# Altium PCB ZYNQ_BOARD.PcbDoc (part 9 of 9)
Units mm, origin at the board's own origin, x right, y up, seen from the top; angles counter-clockwise.
Board outline 120 x 66 mm, 10 copper layers (Top Layer, Internal Plane 1 (GND), Middle Layer 1, Middle Layer 2, Internal Plane 2 (+1.0V), Middle Layer 3, Middle Layer 4, Middle Layer 5 (PWR), Internal Plane 3 (GND), Bottom Layer), stack 0.982 mm thick; 333 components, 331 nets, 1511 pads, 1077 vias.
Unrouted connection lines stored in the file: 30.
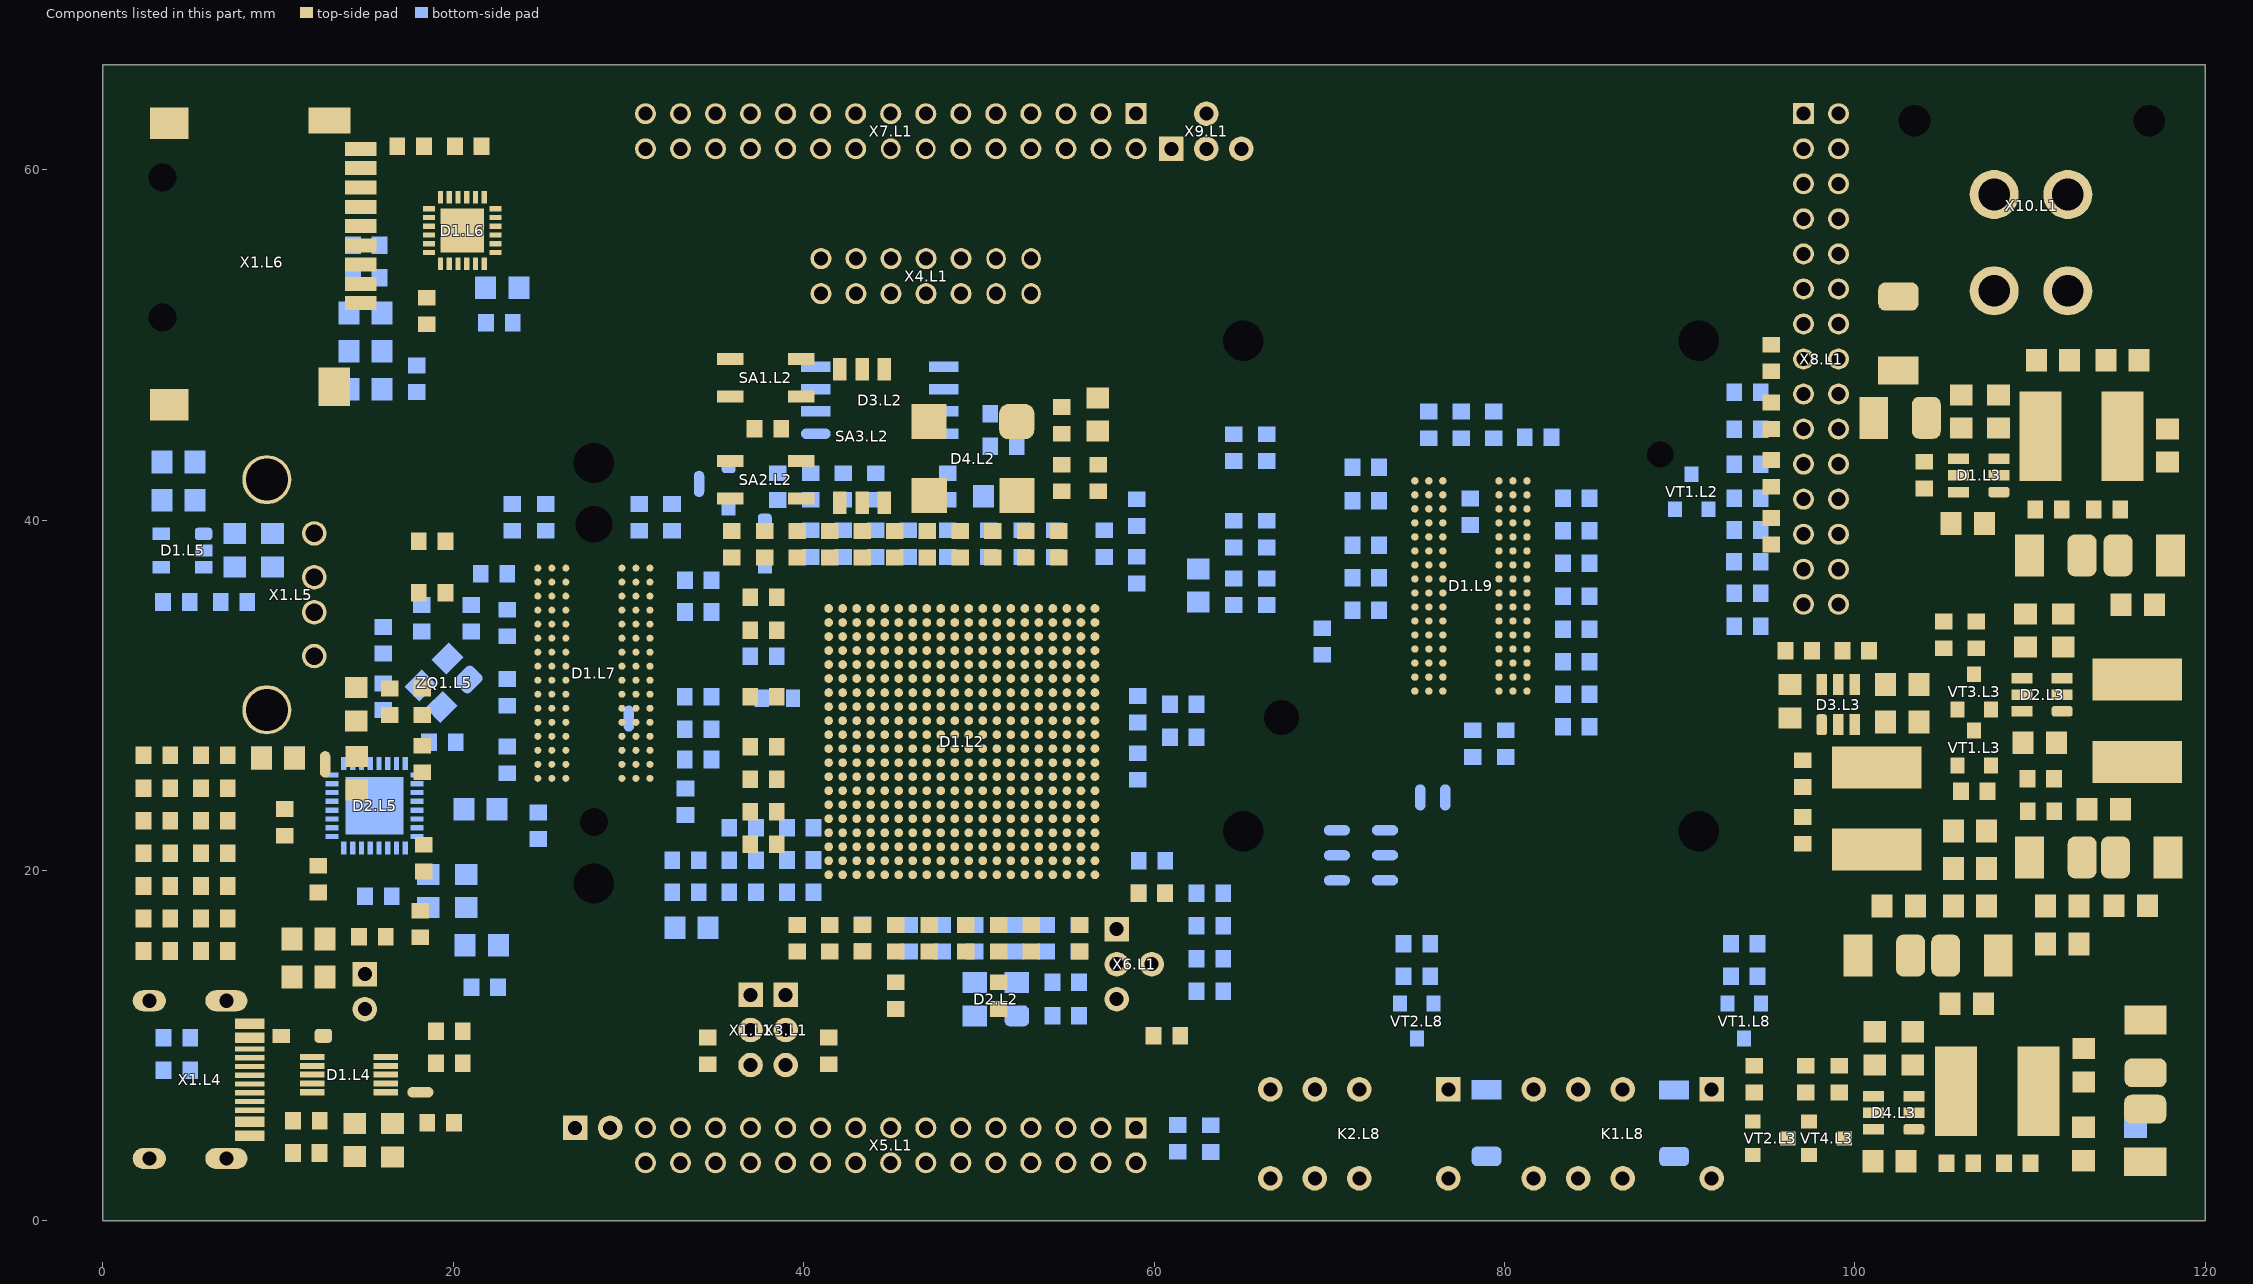
[diagram p17: the components of this part, seen from the top]

## Other copper (continued)
Internal Plane 1 (GND):
  pour cut-out: 1.78,51.576 cw(c3.385,51.576) 4.99,51.576 cw(c3.385,51.576) 3.385,49.971 cw(c3.385,51.576)
  pour cut-out: 1.78,59.576 cw(c3.385,59.576) 4.99,59.576 cw(c3.385,59.576) 3.385,57.971 cw(c3.385,59.576)
  pour cut-out: 10.941,34.557 cw(c12.044,34.73) 12.686,33.817 cw(c12.044,34.73)
  pour cut-out: 10.941,36.557 cw(c12.044,36.73) 12.686,35.817 cw(c12.044,36.73)
  pour cut-out: 26.421,18.369 cw(c28.025,19.246) 29.52,18.195 cw(c28.025,19.246)
  pour cut-out: 26.421,42.369 cw(c28.025,43.246) 29.52,42.195 cw(c28.025,43.246)
  pour cut-out: 68.051,2.242 cw(c69.154,2.415) 69.796,1.502 cw(c69.154,2.415)
  pour cut-out: 65.511,2.242 cw(c66.614,2.415) 67.256,1.502 cw(c66.614,2.415)
  pour cut-out: 68.051,7.322 cw(c69.154,7.495) 69.796,6.582 cw(c69.154,7.495)
  pour cut-out: 65.511,7.322 cw(c66.614,7.495) 67.256,6.582 cw(c66.614,7.495)
  pour cut-out: 65.675,28.735 cw(c67.28,28.735) 68.885,28.735 cw(c67.28,28.735) 67.28,27.13 cw(c67.28,28.735)
  pour cut-out: 75.671,2.242 cw(c76.774,2.415) 77.416,1.502 cw(c76.774,2.415)
  pour cut-out: 80.541,2.242 cw(c81.644,2.415) 82.286,1.502 cw(c81.644,2.415)
  pour cut-out: 83.081,2.242 cw(c84.184,2.415) 84.826,1.502 cw(c84.184,2.415)
  pour cut-out: 83.081,7.322 cw(c84.184,7.495) 84.826,6.582 cw(c84.184,7.495)
  pour cut-out: 80.541,7.322 cw(c81.644,7.495) 82.286,6.582 cw(c81.644,7.495)
  pour cut-out: 90.701,2.242 cw(c91.804,2.415) 92.446,1.502 cw(c91.804,2.415)
  pour cut-out: 89.481,49.349 cw(c91.085,50.226) 92.58,49.175 cw(c91.085,50.226)
  pour cut-out: 106.351,52.194 cw(c107.955,53.071) 109.45,52.02 cw(c107.955,53.071)
  pour cut-out: 106.351,57.694 cw(c107.955,58.571) 109.45,57.52 cw(c107.955,58.571)
  pour cut-out: 10.941,39.057 cw(c12.044,39.23) 12.686,38.317 cw(c12.044,39.23)
  pour cut-out: 27.96,24.082 cw(c28.01,22.755) 27.96,21.429 cw(c28.01,22.755)
  pour cut-out: 27.96,41.082 cw(c28.01,39.755) 27.96,38.429 cw(c28.01,39.755)
  pour cut-out: 39.861,54.742 cw(c40.964,54.915) 41.606,54.002 cw(c40.964,54.915)
  pour cut-out: 51.861,54.742 cw(c52.964,54.915) 53.606,54.002 cw(c52.964,54.915)
  pour cut-out: 89.481,21.349 cw(c91.085,22.226) 92.58,21.175 cw(c91.085,22.226)
  pour cut-out: 115.195,62.78 cw(c116.8,62.78) 118.405,62.78 cw(c116.8,62.78) 116.8,61.175 cw(c116.8,62.78)
  pour cut-out: 63.481,49.349 cw(c65.085,50.226) 66.58,49.175 cw(c65.085,50.226)
  pour cut-out: 85.621,2.242 cw(c86.724,2.415) 87.366,1.502 cw(c86.724,2.415)
  pour cut-out: 70.591,2.242 cw(c71.694,2.415) 72.336,1.502 cw(c71.694,2.415)
  pour cut-out: 85.621,7.322 cw(c86.724,7.495) 87.366,6.582 cw(c86.724,7.495)
  pour cut-out: 70.591,7.322 cw(c71.694,7.495) 72.336,6.582 cw(c71.694,7.495)
  pour cut-out: 87.275,43.735 cw(c88.88,43.735) 90.485,43.735 cw(c88.88,43.735) 88.88,42.13 cw(c88.88,43.735)
  pour cut-out: 63.481,21.349 cw(c65.085,22.226) 66.58,21.175 cw(c65.085,22.226)
  pour cut-out: 101.795,62.796 cw(c103.4,62.796) 105.005,62.796 cw(c103.4,62.796) 103.4,61.191 cw(c103.4,62.796)
  pour cut-out: 10.613,26.79 10.613,26.06 11.286,26.06 11.286,26.79
  pour cut-out: 11.513,22.95 11.513,21.95 11.713,21.75 12.105,21.75 12.6,22.245 12.6,22.672 12.079,23.193
  pour cut-out: 11.612,24.212 11.632,24.212 12.132,23.712 12.608,24.188 12.588,24.188 12.088,24.688
  pour cut-out: 11.99,56.026 11.99,55.353 13.35,55.353 13.35,56.026
  pour cut-out: 16.012,27.068 16.512,27.568 16.512,27.588 16.988,27.112 16.395,26.519 16.379,26.519
  pour cut-out: 18.392,22.712 18.912,22.192 18.912,22.122 19.388,22.598 18.914,23.071 18.73,23.071
  pour cut-out: 19.15,23.786 19.15,24.159 18.97,23.979 18.839,23.979
  pour cut-out: 18.912,24.768 18.912,24.708 18.392,24.188 18.809,23.771 18.866,23.771 19.388,24.292
  pour cut-out: 19.935,7.266 19.935,6.593 21.39,6.593 21.415,6.619 21.415,7.266
  pour cut-out: 24.696,51.545 24.696,50.93 24.663,50.896 24.03,50.896 24.03,51.538 24.023,51.545
  pour cut-out: 41.02,33.296 41.02,32.623 41.806,32.623 41.806,33.296
  pour cut-out: 42.62,35.696 42.622,35.695 43.408,35.695 43.408,35.022 43.407,35.023 42.62,35.023
  pour cut-out: 46.579,11.972 47.195,11.972 47.195,12.644 47.191,12.641 47.044,12.641 46.823,12.862
  pour cut-out: 46.243,13.03 46.243,12.308 46.916,12.308 46.916,13.03
  pour cut-out: 52.389,6.729 53.073,6.729 53.074,6.729 53.074,6.08 52.407,6.08 52.365,6.038
  pour cut-out: 60.611,33.936 61.63,34.956 61.63,35.022 61.6,35.022 61.25,35.372 60.28,34.402 60.28,34.376
  pour cut-out: 61.121,47.348 61.121,46.675 61.76,46.675 61.76,47.348
  pour cut-out: 117.616,34.334 117.621,34.334 117.899,34.612 118.029,34.482 118.029,34.125
  pour cut-out: 18.501,23.639 18.501,23.261 18.561,23.201 18.561,23.161 18.795,23.161 18.953,23.319 18.953,23.676
  pour cut-out: 20.163,24.1 20.163,23.441 20.836,23.441 20.836,24.1
  pour cut-out: 45.25,50.316 45.25,49.643 45.84,49.643 45.84,50.316
  pour cut-out: 55.173,17.96 55.173,17.22 55.639,17.22 55.639,17.842 55.58,17.9
  pour cut-out: 56.25,16.884 56.562,16.884 56.965,17.287 56.665,17.587 56.665,17.9
  pour cut-out: 61.29,12.669 61.29,11.256 62.03,11.256 62.03,12.669
  pour cut-out: 62.351,27.992 62.826,27.516 63.791,28.48 63.792,28.48 63.316,28.956
  pour cut-out: 115.695,5.666 115.695,4.993 116.37,4.993 116.37,5.666
  pour cut-out: 117.884,35.613 118.557,35.613 118.557,33.392 118.245,33.392 117.875,33.762
  pour cut-out: 7.37,6.006 7.37,5.333 8.88,5.333 8.88,6.006
  pour cut-out: 7.84,10.806 7.84,10.133 10.1,10.133 10.1,10.806
  pour cut-out: 21.752,6.93 21.752,6.19 21.079,6.19 21.079,6.487 20.895,6.671
  pour cut-out: 19.29,20.327 19.29,19.654 20.05,19.654 20.05,20.327
  pour cut-out: 14.982,27.068 15.458,26.592 15.458,26.696 15.922,27.161 15.372,27.512
  pour cut-out: 19.472,52.858 19.472,52.928 20.482,53.938 20.958,53.462 20.958,53.392 19.948,52.382
  pour cut-out: 23.102,55.042 23.108,55.042 23.741,54.409 23.883,54.551 23.883,54.969
  pour cut-out: 24.206,55.86 24.206,54.72 23.879,54.72 23.749,54.59 23.559,54.78 23.559,55.59
  pour cut-out: 45.355,48.738 46.028,48.738 46.028,48.06 45.355,48.06
  pour cut-out: 62.77,12.669 62.77,11.996 62.497,11.997 62.23,11.73 62.03,11.93 62.03,12.669 62.356,12.621
  pour cut-out: 96.703,10.43 96.703,9.69 97.04,9.353 99.26,9.353 99.597,9.69 99.597,10.43 99.26,10.766 97.04,10.766
  pour cut-out: 107.943,12.86 107.943,12.12 108.28,11.783 111.24,11.783 111.577,12.12 111.577,12.86 111.24,13.196 108.28,13.196
  pour cut-out: 113.78,33.729 113.78,33.056 118.221,33.056 117.548,33.729
  pour cut-out: 8.843,21.86 8.843,20.38 9.18,20.043 10.66,20.043 10.996,20.38 10.996,21.12 10.66,21.456 9.765,21.456 9.49,21.731
  pour cut-out: 10.918,36.704 10.918,34.642 10.93,34.63 10.999,34.699 13.17,34.699 13.17,36.832 13.154,36.848
  pour cut-out: 18.021,13.435 18.021,12.695 18.357,12.359 19.837,12.359 20.174,12.695 20.174,13.435 19.837,13.772 18.357,13.772
  pour cut-out: 16.012,19.312 16.488,19.788 16.468,19.788 15.988,20.268 15.512,19.792
  pour cut-out: 15.343,27.95 15.343,27.39 16.016,27.39 16.016,27.95
  pour cut-out: 23.766,50.674 23.369,50.277 23.162,50.277 23.162,50.095 23.529,49.729 24.042,50.242 24.122,50.242
  pour cut-out: 23.102,55.518 23.7,56.116 23.799,56.116 23.799,55.931 24.108,55.622
  pour cut-out: 46.132,36.119 46.132,35.384 46.156,35.36 45.483,35.36 45.483,36.095 45.459,36.119
  pour cut-out: 50.025,43.455 50.025,43.52 50.992,44.487 50.552,44.927 50.552,44.898 49.658,44.004
  pour cut-out: 55.51,18.297 56.99,18.297 56.99,18.22 57.252,17.958 56.756,17.462 55.899,17.462
  pour cut-out: 75.773,8.51 77.782,8.51 77.782,6.5 75.773,6.5
  pour cut-out: 90.803,8.51 92.812,8.51 92.812,6.5 90.803,6.5
  pour cut-out: 100.481,33.885 100.481,33.325 101.153,33.325 101.153,33.885
  pour cut-out: 105.904,38.17 105.904,36.69 106.24,36.353 107.72,36.353 108.057,36.69 108.057,38.17 107.72,38.506 106.24,38.506
  pour cut-out: 112.71,5.666 112.71,4.993 113.357,4.993 113.357,5.666
  pour cut-out: 112.415,12.991 112.415,10.771 112.751,10.434 113.535,10.434 114.568,11.468 114.568,12.991 114.232,13.328 112.751,13.328
  pour cut-out: 114.234,16.302 114.234,15.561 114.57,15.225 118.271,15.225 118.607,15.561 118.607,16.302 118.271,16.638 114.57,16.638
  pour cut-out: 116.05,33.64 116.052,33.64 116.74,34.328 116.74,34.469 117.48,34.469 117.751,34.199 117.751,33.605
  pour cut-out: 17.281,15.306 17.281,14.565 17.617,14.229 19.097,14.229 19.434,14.565 19.434,15.306 19.097,15.642 17.617,15.642
  pour cut-out: 19.259,48.63 19.932,48.63 19.932,46.84 19.259,46.84
  pour cut-out: 25.85,6.381 25.85,4.246 30.027,4.246 30.027,6.381
  pour cut-out: 33.673,15.072 33.673,13.592 34.01,13.256 34.75,13.256 35.826,14.332 35.826,15.072 35.49,15.409 34.01,15.409
  pour cut-out: 31.212,15.072 31.212,13.592 31.548,13.256 33.028,13.256 33.365,13.592 33.365,15.072 33.028,15.409 31.548,15.409
  pour cut-out: 56.715,17.812 60.991,17.812 60.991,11.511 56.715,11.511
  pour cut-out: 96.103,64.163 100.02,64.163 100.02,38.23 96.103,38.23
  pour cut-out: 35.89,14.052 40.096,14.052 40.096,7.751 35.89,7.751
  pour cut-out: 16.011,15.19 13.876,15.19 13.876,11.013 16.011,11.013
  pour cut-out: 40.94,53.79 40.966,53.816 40.966,56.041 52.966,56.041 52.94,56.015 52.94,53.79
  pour cut-out: 59.827,60.245 59.827,64.161 66.129,64.161 66.129,60.245
  pour cut-out: 59.928,6.281 59.928,2.365 31.909,2.365 31.909,6.281
  pour cut-out: 59.928,64.161 59.928,60.245 31.95,60.245 31.95,64.161
Internal Plane 3 (GND):
  pour cut-out: 65.512,2.242 cw(c66.614,2.415) 67.256,1.502 cw(c66.614,2.415)
  pour cut-out: 1.78,51.577 cw(c3.385,51.576) 4.99,51.577 cw(c3.385,51.576) 3.385,49.972 cw(c3.385,51.576)
  pour cut-out: 27.96,24.082 cw(c28.01,22.756) 27.96,21.429 cw(c28.01,22.756)
  pour cut-out: 63.482,49.349 cw(c65.085,50.226) 66.58,49.175 cw(c65.085,50.226)
  pour cut-out: 51.862,54.742 cw(c52.964,54.915) 53.606,54.002 cw(c52.964,54.915)
  pour cut-out: 39.862,54.742 cw(c40.964,54.915) 41.606,54.002 cw(c40.964,54.915)
  pour cut-out: 10.942,34.557 cw(c12.044,34.73) 12.686,33.817 cw(c12.044,34.73)
  pour cut-out: 10.942,36.557 cw(c12.044,36.73) 12.686,35.817 cw(c12.044,36.73)
  pour cut-out: 10.942,39.057 cw(c12.044,39.23) 12.686,38.317 cw(c12.044,39.23)
  pour cut-out: 80.542,2.242 cw(c81.644,2.415) 82.286,1.502 cw(c81.644,2.415)
  pour cut-out: 90.702,2.242 cw(c91.804,2.415) 92.446,1.502 cw(c91.804,2.415)
  pour cut-out: 85.622,2.242 cw(c86.724,2.415) 87.366,1.502 cw(c86.724,2.415)
  pour cut-out: 83.082,2.242 cw(c84.184,2.415) 84.826,1.502 cw(c84.184,2.415)
  pour cut-out: 85.622,7.322 cw(c86.724,7.495) 87.366,6.582 cw(c86.724,7.495)
  pour cut-out: 83.082,7.322 cw(c84.184,7.495) 84.826,6.582 cw(c84.184,7.495)
  pour cut-out: 80.542,7.322 cw(c81.644,7.495) 82.286,6.582 cw(c81.644,7.495)
  pour cut-out: 75.672,2.242 cw(c76.774,2.415) 77.416,1.502 cw(c76.774,2.415)
  pour cut-out: 70.592,7.322 cw(c71.694,7.495) 72.336,6.582 cw(c71.694,7.495)
  pour cut-out: 68.052,7.322 cw(c69.154,7.495) 69.796,6.582 cw(c69.154,7.495)
  pour cut-out: 65.512,7.322 cw(c66.614,7.495) 67.256,6.582 cw(c66.614,7.495)
  pour cut-out: 70.592,2.242 cw(c71.694,2.415) 72.336,1.502 cw(c71.694,2.415)
  pour cut-out: 68.052,2.242 cw(c69.154,2.415) 69.796,1.502 cw(c69.154,2.415)
  pour cut-out: 27.96,41.082 cw(c28.01,39.756) 27.96,38.429 cw(c28.01,39.756)
  pour cut-out: 1.78,59.577 cw(c3.385,59.576) 4.99,59.577 cw(c3.385,59.576) 3.385,57.972 cw(c3.385,59.576)
  pour cut-out: 26.422,18.369 cw(c28.025,19.246) 29.52,18.195 cw(c28.025,19.246)
  pour cut-out: 26.422,42.369 cw(c28.025,43.246) 29.52,42.195 cw(c28.025,43.246)
  pour cut-out: 63.482,21.349 cw(c65.085,22.226) 66.58,21.175 cw(c65.085,22.226)
  pour cut-out: 89.482,21.349 cw(c91.085,22.226) 92.58,21.175 cw(c91.085,22.226)
  pour cut-out: 89.482,49.349 cw(c91.085,50.226) 92.58,49.175 cw(c91.085,50.226)
  pour cut-out: 106.352,52.194 cw(c107.955,53.071) 109.45,52.02 cw(c107.955,53.071)
  pour cut-out: 106.352,57.694 cw(c107.955,58.571) 109.45,57.52 cw(c107.955,58.571)
  pour cut-out: 115.195,62.78 cw(c116.8,62.78) 118.405,62.78 cw(c116.8,62.78) 116.8,61.175 cw(c116.8,62.78)
  pour cut-out: 101.795,62.797 cw(c103.4,62.796) 105.005,62.797 cw(c103.4,62.796) 103.4,61.192 cw(c103.4,62.796)
  pour cut-out: 87.275,43.735 cw(c88.88,43.735) 90.485,43.735 cw(c88.88,43.735) 88.88,42.13 cw(c88.88,43.735)
  pour cut-out: 65.675,28.735 cw(c67.28,28.735) 68.885,28.735 cw(c67.28,28.735) 67.28,27.13 cw(c67.28,28.735)
  pour cut-out: 105.904,38.17 105.904,36.69 106.24,36.353 107.721,36.353 108.057,36.69 108.057,38.17 107.721,38.506 106.24,38.506
  pour cut-out: 117.616,34.334 117.621,34.334 117.899,34.612 118.029,34.482 118.029,34.125
  pour cut-out: 116.05,33.64 116.052,33.64 116.741,34.328 116.741,34.469 117.481,34.469 117.751,34.199 117.751,33.605
  pour cut-out: 113.78,33.729 113.78,33.056 118.221,33.056 117.548,33.729
  pour cut-out: 117.884,35.613 118.557,35.613 118.557,33.392 118.245,33.392 117.875,33.763
  pour cut-out: 100.481,33.885 100.481,33.325 101.154,33.325 101.154,33.885
  pour cut-out: 114.234,16.302 114.234,15.562 114.57,15.225 118.271,15.225 118.607,15.562 118.607,16.302 118.271,16.638 114.57,16.638
  pour cut-out: 112.415,12.991 112.415,10.771 112.751,10.435 113.535,10.435 114.568,11.468 114.568,12.991 114.232,13.328 112.751,13.328
  pour cut-out: 107.944,12.86 107.944,12.12 108.28,11.783 111.241,11.783 111.577,12.12 111.577,12.86 111.241,13.196 108.28,13.196
  pour cut-out: 112.71,5.666 112.71,4.994 113.357,4.994 113.357,5.666
  pour cut-out: 115.695,5.666 115.695,4.994 116.37,4.994 116.37,5.666
  pour cut-out: 96.704,10.43 96.704,9.69 97.04,9.353 99.26,9.353 99.597,9.69 99.597,10.43 99.26,10.766 97.04,10.766
  pour cut-out: 41.02,33.296 41.02,32.624 41.806,32.624 41.806,33.296
  pour cut-out: 40.941,53.79 40.967,53.816 40.967,56.041 52.967,56.041 52.941,56.015 52.941,53.79
  pour cut-out: 10.918,36.704 10.918,34.642 10.93,34.631 10.999,34.699 13.17,34.699 13.17,36.832 13.154,36.848
  pour cut-out: 90.803,8.51 92.812,8.51 92.812,6.5 90.803,6.5
  pour cut-out: 75.773,8.51 77.782,8.51 77.782,6.5 75.773,6.5
  pour cut-out: 62.351,27.992 62.827,27.516 63.791,28.48 63.792,28.48 63.316,28.956
  pour cut-out: 62.77,12.669 62.77,11.996 62.497,11.997 62.23,11.73 62.03,11.93 62.03,12.669 62.357,12.621
  pour cut-out: 61.29,12.669 61.29,11.256 62.03,11.256 62.03,12.669
  pour cut-out: 52.389,6.729 53.073,6.729 53.074,6.729 53.074,6.08 52.407,6.08 52.365,6.038
  pour cut-out: 56.25,16.884 56.562,16.884 56.965,17.287 56.665,17.587 56.665,17.9
  pour cut-out: 55.51,18.297 56.99,18.297 56.99,18.221 57.252,17.959 56.756,17.462 55.899,17.462
  pour cut-out: 55.174,17.96 55.174,17.22 55.639,17.22 55.639,17.842 55.58,17.9
  pour cut-out: 60.611,33.937 61.63,34.956 61.63,35.022 61.6,35.022 61.25,35.372 60.28,34.402 60.28,34.376
  pour cut-out: 61.121,47.349 61.121,46.676 61.76,46.676 61.76,47.349
  pour cut-out: 50.025,43.455 50.025,43.52 50.992,44.487 50.553,44.927 50.553,44.898 49.658,44.004
  pour cut-out: 45.25,50.316 45.25,49.644 45.84,49.644 45.84,50.316
  pour cut-out: 45.355,48.738 46.028,48.738 46.028,48.06 45.355,48.06
  pour cut-out: 16.011,15.19 13.876,15.19 13.876,11.013 16.011,11.013
  pour cut-out: 25.85,6.381 25.85,4.246 30.027,4.246 30.027,6.381
  pour cut-out: 46.58,11.972 47.195,11.972 47.195,12.645 47.191,12.641 47.044,12.641 46.823,12.862
  pour cut-out: 46.243,13.03 46.243,12.308 46.916,12.308 46.916,13.03
  pour cut-out: 23.766,50.674 23.37,50.277 23.162,50.277 23.162,50.095 23.529,49.729 24.042,50.242 24.122,50.242
  pour cut-out: 24.696,51.545 24.696,50.93 24.663,50.897 24.03,50.897 24.03,51.538 24.024,51.545
  pour cut-out: 23.102,55.042 23.108,55.042 23.741,54.409 23.883,54.551 23.883,54.969
  pour cut-out: 24.206,55.86 24.206,54.72 23.88,54.72 23.75,54.59 23.559,54.78 23.559,55.59
  pour cut-out: 23.102,55.518 23.7,56.116 23.799,56.116 23.799,55.931 24.108,55.622
  pour cut-out: 19.472,52.858 19.472,52.928 20.482,53.938 20.958,53.462 20.958,53.392 19.948,52.382
  pour cut-out: 11.99,56.026 11.99,55.354 13.35,55.354 13.35,56.026
  pour cut-out: 19.26,48.63 19.933,48.63 19.933,46.84 19.26,46.84
  pour cut-out: 33.673,15.073 33.673,13.592 34.01,13.256 34.75,13.256 35.826,14.332 35.826,15.073 35.49,15.409 34.01,15.409
  pour cut-out: 31.212,15.073 31.212,13.592 31.548,13.256 33.028,13.256 33.365,13.592 33.365,15.073 33.028,15.409 31.548,15.409
  pour cut-out: 19.15,23.786 19.15,24.159 18.971,23.979 18.839,23.979
  pour cut-out: 18.501,23.639 18.501,23.261 18.561,23.201 18.561,23.161 18.795,23.161 18.954,23.319 18.954,23.676
  pour cut-out: 18.392,22.712 18.912,22.192 18.912,22.122 19.388,22.598 18.914,23.071 18.73,23.071
  pour cut-out: 18.912,24.768 18.912,24.708 18.392,24.188 18.809,23.771 18.867,23.771 19.388,24.292
  pour cut-out: 19.29,20.327 19.29,19.654 20.05,19.654 20.05,20.327
  pour cut-out: 20.164,24.1 20.164,23.442 20.836,23.442 20.836,24.1
  pour cut-out: 16.012,19.312 16.488,19.788 16.468,19.788 15.988,20.268 15.512,19.792
  pour cut-out: 18.021,13.435 18.021,12.695 18.357,12.359 19.838,12.359 20.174,12.695 20.174,13.435 19.838,13.772 18.357,13.772
  pour cut-out: 17.281,15.306 17.281,14.566 17.617,14.229 19.097,14.229 19.434,14.566 19.434,15.306 19.097,15.642 17.617,15.642
  pour cut-out: 21.752,6.93 21.752,6.19 21.079,6.19 21.079,6.487 20.895,6.671
  pour cut-out: 19.935,7.266 19.935,6.593 21.39,6.593 21.416,6.619 21.416,7.266
  pour cut-out: 7.37,6.006 7.37,5.334 8.88,5.334 8.88,6.006
  pour cut-out: 7.84,10.806 7.84,10.134 10.1,10.134 10.1,10.806
  pour cut-out: 14.982,27.068 15.458,26.592 15.458,26.697 15.922,27.161 15.372,27.512
  pour cut-out: 15.344,27.95 15.344,27.39 16.016,27.39 16.016,27.95
  pour cut-out: 16.012,27.068 16.512,27.568 16.512,27.588 16.988,27.112 16.395,26.519 16.379,26.519
  pour cut-out: 11.612,24.212 11.632,24.212 12.132,23.712 12.608,24.188 12.588,24.188 12.088,24.688
  pour cut-out: 10.614,26.79 10.614,26.06 11.286,26.06 11.286,26.79
  pour cut-out: 8.843,21.86 8.843,20.38 9.18,20.044 10.66,20.044 10.996,20.38 10.996,21.12 10.66,21.457 9.765,21.457 9.491,21.732
  pour cut-out: 11.514,22.95 11.514,21.95 11.714,21.75 12.105,21.75 12.6,22.245 12.6,22.672 12.079,23.193
  pour cut-out: 59.828,60.245 59.828,64.161 66.129,64.161 66.129,60.245
  pour cut-out: 56.716,17.812 60.991,17.812 60.991,11.511 56.716,11.511
  pour cut-out: 35.89,14.052 40.096,14.052 40.096,7.751 35.89,7.751
  pour cut-out: 46.132,36.119 46.132,35.384 46.156,35.36 45.484,35.36 45.484,36.095 45.46,36.119
  pour cut-out: 42.62,35.696 42.622,35.695 43.408,35.695 43.408,35.022 43.407,35.024 42.62,35.024
  pour cut-out: 59.928,64.161 59.928,60.245 31.95,60.245 31.95,64.161
  pour cut-out: 59.928,6.281 59.928,2.365 31.909,2.365 31.909,6.281
  pour cut-out: 96.104,64.163 100.02,64.163 100.02,38.23 96.104,38.23
Internal Plane 2 (+1.0V):
  pour cut-out: 96.28,51.117 ccw(c97.071,51.187) 97.588,51.791 ccw(c97.073,51.184)
  pour cut-out: 109.504,34.035 ccw(c109.719,34.656) 109.68,35.311 ccw(c109.719,34.656)
  pour cut-out: 70.384,44.9 ccw(c70.771,44.9) 71.159,44.9 ccw(c70.771,44.9) 70.771,45.287 ccw(c70.771,44.9)
  pour cut-out: 71.103,44.9 ccw(c71.49,44.9) 71.877,44.9 ccw(c71.49,44.9) 71.49,45.287 ccw(c71.49,44.9)
  pour cut-out: 71.103,45.518 ccw(c71.49,45.518) 71.877,45.518 ccw(c71.49,45.518) 71.49,45.905 ccw(c71.49,45.518)
  pour cut-out: 61.952,14.98 ccw(c62.34,14.98) 62.727,14.98 ccw(c62.34,14.98) 62.34,15.367 ccw(c62.34,14.98)
  pour cut-out: 62.383,12.333 ccw(c62.77,12.333) 63.158,12.333 ccw(c62.77,12.333) 62.77,12.72 ccw(c62.77,12.333)
  pour cut-out: 61.643,11.592 ccw(c62.03,11.592) 62.418,11.592 ccw(c62.03,11.592) 62.03,11.98 ccw(c62.03,11.592)
  pour cut-out: 60.903,11.592 ccw(c61.29,11.592) 61.677,11.592 ccw(c61.29,11.592) 61.29,11.98 ccw(c61.29,11.592)
  pour cut-out: 60.903,12.333 ccw(c61.29,12.333) 61.677,12.333 ccw(c61.29,12.333) 61.29,12.72 ccw(c61.29,12.333)
  pour cut-out: 61.643,12.333 ccw(c62.03,12.333) 62.418,12.333 ccw(c62.03,12.333) 62.03,12.72 ccw(c62.03,12.333)
  pour cut-out: 61.952,13.111 ccw(c62.34,13.111) 62.727,13.111 ccw(c62.34,13.111) 62.34,13.499 ccw(c62.34,13.111)
  pour cut-out: 63.552,13.111 ccw(c63.94,13.111) 64.327,13.111 ccw(c63.94,13.111) 63.94,13.499 ccw(c63.94,13.111)
  pour cut-out: 63.552,14.98 ccw(c63.94,14.98) 64.327,14.98 ccw(c63.94,14.98) 63.94,15.367 ccw(c63.94,14.98)
  pour cut-out: 110.853,12.12 ccw(c111.241,12.12) 111.628,12.12 ccw(c111.241,12.12) 111.241,12.507 ccw(c111.241,12.12)
  pour cut-out: 110.853,12.86 ccw(c111.241,12.86) 111.628,12.86 ccw(c111.241,12.86) 111.241,13.247 ccw(c111.241,12.86)
  pour cut-out: 110.113,12.86 ccw(c110.5,12.86) 110.888,12.86 ccw(c110.5,12.86) 110.5,13.247 ccw(c110.5,12.86)
  pour cut-out: 110.113,12.12 ccw(c110.5,12.12) 110.888,12.12 ccw(c110.5,12.12) 110.5,12.507 ccw(c110.5,12.12)
  pour cut-out: 109.373,12.12 ccw(c109.76,12.12) 110.148,12.12 ccw(c109.76,12.12) 109.76,12.507 ccw(c109.76,12.12)
  pour cut-out: 109.373,12.86 ccw(c109.76,12.86) 110.148,12.86 ccw(c109.76,12.86) 109.76,13.247 ccw(c109.76,12.86)
  pour cut-out: 108.633,12.12 ccw(c109.02,12.12) 109.408,12.12 ccw(c109.02,12.12) 109.02,12.507 ccw(c109.02,12.12)
  pour cut-out: 108.633,12.86 ccw(c109.02,12.86) 109.408,12.86 ccw(c109.02,12.86) 109.02,13.247 ccw(c109.02,12.86)
  pour cut-out: 107.893,12.86 ccw(c108.28,12.86) 108.667,12.86 ccw(c108.28,12.86) 108.28,13.247 ccw(c108.28,12.86)
  pour cut-out: 98.28,51.117 ccw(c99.071,51.187) 99.588,51.791 ccw(c99.073,51.184)
  pour cut-out: 94.813,50.02 ccw(c95.2,50.02) 95.587,50.02 ccw(c95.2,50.02) 95.2,50.407 ccw(c95.2,50.02)
  pour cut-out: 65.512,7.322 cw(c66.614,7.495) 67.256,6.582 cw(c66.614,7.495)
  pour cut-out: 55.35,37.26 ccw(c55.737,37.26) 56.125,37.26 ccw(c55.737,37.26) 55.737,37.648 ccw(c55.737,37.26)
  pour cut-out: 107.893,12.12 ccw(c108.28,12.12) 108.667,12.12 ccw(c108.28,12.12) 108.28,12.507 ccw(c108.28,12.12)
  pour cut-out: 95.826,15.333 ccw(c96.213,15.333) 96.6,15.333 ccw(c96.213,15.333) 96.213,15.72 ccw(c96.213,15.333)
  pour cut-out: 96.737,15.03 ccw(c97.125,15.03) 97.512,15.03 ccw(c97.125,15.03) 97.125,15.417 ccw(c97.125,15.03)
  pour cut-out: 96.737,15.58 ccw(c97.125,15.58) 97.512,15.58 ccw(c97.125,15.58) 97.125,15.967 ccw(c97.125,15.58)
  pour cut-out: 100.248,15.375 ccw(c100.635,15.375) 101.022,15.375 ccw(c100.635,15.375) 100.635,15.762 ccw(c100.635,15.375)
  pour cut-out: 100.242,15.97 ccw(c100.629,15.97) 101.017,15.97 ccw(c100.629,15.97) 100.629,16.357 ccw(c100.629,15.97)
  pour cut-out: 76.928,14.93 ccw(c77.316,14.93) 77.703,14.93 ccw(c77.316,14.93) 77.316,15.318 ccw(c77.316,14.93)
  pour cut-out: 100.242,14.75 ccw(c100.629,14.75) 101.017,14.75 ccw(c100.629,14.75) 100.629,15.137 ccw(c100.629,14.75)
  pour cut-out: 52.313,6.6 ccw(c52.7,6.6) 53.087,6.6 ccw(c52.7,6.6) 52.7,6.987 ccw(c52.7,6.6)
  pour cut-out: 100.899,10.18 ccw(c101.114,10.801) 101.075,11.456 ccw(c101.114,10.801)
  pour cut-out: 103.074,10.18 ccw(c103.289,10.801) 103.25,11.456 ccw(c103.289,10.801)
  pour cut-out: 111.659,34.035 ccw(c111.874,34.656) 111.835,35.311 ccw(c111.874,34.656)
  pour cut-out: 63.094,41.853 ccw(c63.481,41.854) 63.869,41.854 ccw(c63.481,41.854) 63.481,42.241 ccw(c63.481,41.854)
  pour cut-out: 41.489,43.286 ccw(c41.876,43.286) 42.263,43.286 ccw(c41.876,43.286) 41.876,43.673 ccw(c41.876,43.286)
  pour cut-out: 43.873,39.35 ccw(c44.26,39.35) 44.647,39.35 ccw(c44.26,39.35) 44.26,39.737 ccw(c44.26,39.35)
  pour cut-out: 42.04,39.206 ccw(c42.427,39.206) 42.815,39.206 ccw(c42.427,39.206) 42.427,39.593 ccw(c42.427,39.206)
  pour cut-out: 34.362,13.592 ccw(c34.75,13.592) 35.137,13.592 ccw(c34.75,13.592) 34.75,13.98 ccw(c34.75,13.592)
  pour cut-out: 33.622,13.592 ccw(c34.01,13.592) 34.397,13.592 ccw(c34.01,13.592) 34.01,13.98 ccw(c34.01,13.592)
  pour cut-out: 33.622,14.332 ccw(c34.01,14.332) 34.397,14.332 ccw(c34.01,14.332) 34.01,14.72 ccw(c34.01,14.332)
  pour cut-out: 34.362,14.332 ccw(c34.75,14.332) 35.137,14.332 ccw(c34.75,14.332) 34.75,14.72 ccw(c34.75,14.332)
  pour cut-out: 35.103,14.332 ccw(c35.49,14.332) 35.877,14.332 ccw(c35.49,14.332) 35.49,14.72 ccw(c35.49,14.332)
  pour cut-out: 35.103,15.073 ccw(c35.49,15.073) 35.877,15.073 ccw(c35.49,15.073) 35.49,15.46 ccw(c35.49,15.073)
  pour cut-out: 34.362,15.073 ccw(c34.75,15.073) 35.137,15.073 ccw(c34.75,15.073) 34.75,15.46 ccw(c34.75,15.073)
  pour cut-out: 33.622,15.073 ccw(c34.01,15.073) 34.397,15.073 ccw(c34.01,15.073) 34.01,15.46 ccw(c34.01,15.073)
  pour cut-out: 31.161,13.592 ccw(c31.548,13.592) 31.936,13.592 ccw(c31.548,13.592) 31.548,13.98 ccw(c31.548,13.592)
  pour cut-out: 31.901,13.592 ccw(c32.288,13.592) 32.676,13.592 ccw(c32.288,13.592) 32.288,13.98 ccw(c32.288,13.592)
  pour cut-out: 32.641,13.592 ccw(c33.028,13.592) 33.416,13.592 ccw(c33.028,13.592) 33.028,13.98 ccw(c33.028,13.592)
  pour cut-out: 32.641,14.332 ccw(c33.028,14.332) 33.416,14.332 ccw(c33.028,14.332) 33.028,14.72 ccw(c33.028,14.332)
  pour cut-out: 32.641,15.073 ccw(c33.028,15.073) 33.416,15.073 ccw(c33.028,15.073) 33.028,15.46 ccw(c33.028,15.073)
  pour cut-out: 31.901,14.332 ccw(c32.288,14.332) 32.676,14.332 ccw(c32.288,14.332) 32.288,14.72 ccw(c32.288,14.332)
  pour cut-out: 31.161,14.332 ccw(c31.548,14.332) 31.936,14.332 ccw(c31.548,14.332) 31.548,14.72 ccw(c31.548,14.332)
  pour cut-out: 31.901,15.073 ccw(c32.288,15.073) 32.676,15.073 ccw(c32.288,15.073) 32.288,15.46 ccw(c32.288,15.073)
  pour cut-out: 31.161,15.073 ccw(c31.548,15.073) 31.936,15.073 ccw(c31.548,15.073) 31.548,15.46 ccw(c31.548,15.073)
  pour cut-out: 37.943,22.453 ccw(c38.33,22.453) 38.717,22.453 ccw(c38.33,22.453) 38.33,22.841 ccw(c38.33,22.453)
  pour cut-out: 36.028,8.9 ccw(c36.964,8.9) 37.9,8.9 ccw(c36.964,8.9)
  pour cut-out: 38.028,8.9 ccw(c38.964,8.9) 39.9,8.9 ccw(c38.964,8.9)
  pour cut-out: 38.028,10.9 ccw(c38.964,10.9) 39.9,10.9 ccw(c38.964,10.9)
  pour cut-out: 36.028,10.9 ccw(c36.964,10.9) 37.9,10.9 ccw(c36.964,10.9)
  pour cut-out: 39.243,15.61 ccw(c39.63,15.61) 40.017,15.61 ccw(c39.63,15.61) 39.63,15.998 ccw(c39.63,15.61)
  pour cut-out: 41.378,15.61 ccw(c41.765,15.61) 42.153,15.61 ccw(c41.765,15.61) 41.765,15.998 ccw(c41.765,15.61)
  pour cut-out: 40.843,15.61 ccw(c41.23,15.61) 41.617,15.61 ccw(c41.23,15.61) 41.23,15.998 ccw(c41.23,15.61)
  pour cut-out: 37.373,38.43 ccw(c37.76,38.43) 38.147,38.43 ccw(c37.76,38.43) 37.76,38.817 ccw(c37.76,38.43)
  pour cut-out: 70.384,45.518 ccw(c70.771,45.518) 71.159,45.518 ccw(c70.771,45.518) 70.771,45.905 ccw(c70.771,45.518)
  pour cut-out: 67.713,44.187 ccw(c68.1,44.187) 68.487,44.187 ccw(c68.1,44.187) 68.1,44.574 ccw(c68.1,44.187)
  pour cut-out: 60.749,42.911 ccw(c61.136,42.911) 61.524,42.911 ccw(c61.136,42.911) 61.136,43.298 ccw(c61.136,42.911)
  pour cut-out: 61.243,43.19 ccw(c61.63,43.19) 62.017,43.19 ccw(c61.63,43.19) 61.63,43.577 ccw(c61.63,43.19)
  pour cut-out: 60.744,43.53 ccw(c61.132,43.53) 61.519,43.53 ccw(c61.132,43.53) 61.132,43.918 ccw(c61.132,43.53)
  pour cut-out: 54.77,39.865 ccw(c55.158,39.865) 55.545,39.865 ccw(c55.158,39.865) 55.158,40.252 ccw(c55.158,39.865)
  pour cut-out: 54.196,41.705 ccw(c54.583,41.705) 54.971,41.705 ccw(c54.583,41.705) 54.583,42.093 ccw(c54.583,41.705)
  pour cut-out: 51.893,47.681 ccw(c52.281,47.681) 52.668,47.681 ccw(c52.281,47.681) 52.281,48.068 ccw(c52.281,47.681)
  pour cut-out: 51.442,48.06 ccw(c51.83,48.06) 52.217,48.06 ccw(c51.83,48.06) 51.83,48.447 ccw(c51.83,48.06)
  pour cut-out: 49.125,47.173 ccw(c49.513,47.173) 49.9,47.173 ccw(c49.513,47.173) 49.513,47.561 ccw(c49.513,47.173)
  pour cut-out: 49.125,47.774 ccw(c49.513,47.774) 49.9,47.774 ccw(c49.513,47.774) 49.513,48.161 ccw(c49.513,47.774)
  pour cut-out: 48.203,47.475 ccw(c48.59,47.475) 48.977,47.475 ccw(c48.59,47.475) 48.59,47.862 ccw(c48.59,47.475)
  pour cut-out: 48.203,48.745 ccw(c48.59,48.745) 48.977,48.745 ccw(c48.59,48.745) 48.59,49.132 ccw(c48.59,48.745)
  pour cut-out: 48.203,46.205 ccw(c48.59,46.205) 48.977,46.205 ccw(c48.59,46.205) 48.59,46.592 ccw(c48.59,46.205)
  pour cut-out: 39.032,44.219 ccw(c39.419,44.219) 39.806,44.219 ccw(c39.419,44.219) 39.419,44.606 ccw(c39.419,44.219)
  pour cut-out: 38.202,44.229 ccw(c38.589,44.229) 38.976,44.229 ccw(c38.589,44.229) 38.589,44.616 ccw(c38.589,44.229)
  pour cut-out: 37.464,43.871 ccw(c37.852,43.871) 38.239,43.871 ccw(c37.852,43.871) 37.852,44.258 ccw(c37.852,43.871)
  pour cut-out: 36.443,40.23 ccw(c36.83,40.23) 37.217,40.23 ccw(c36.83,40.23) 36.83,40.617 ccw(c36.83,40.23)
  pour cut-out: 43.963,37.9 ccw(c44.35,37.9) 44.737,37.9 ccw(c44.35,37.9) 44.35,38.287 ccw(c44.35,37.9)
  pour cut-out: 52.741,7.027 ccw(c53.128,7.027) 53.516,7.027 ccw(c53.128,7.027) 53.128,7.414 ccw(c53.128,7.027)
  pour cut-out: 47.013,9.43 ccw(c47.4,9.43) 47.787,9.43 ccw(c47.4,9.43) 47.4,9.817 ccw(c47.4,9.43)
  pour cut-out: 46.807,12.308 ccw(c47.195,12.308) 47.582,12.308 ccw(c47.195,12.308) 47.195,12.696 ccw(c47.195,12.308)
  pour cut-out: 46.192,12.308 ccw(c46.58,12.308) 46.967,12.308 ccw(c46.58,12.308) 46.58,12.696 ccw(c46.58,12.308)
  pour cut-out: 46.192,13.03 ccw(c46.58,13.03) 46.967,13.03 ccw(c46.58,13.03) 46.58,13.417 ccw(c46.58,13.03)
  pour cut-out: 43.641,12.101 ccw(c44.029,12.101) 44.416,12.101 ccw(c44.029,12.101) 44.029,12.489 ccw(c44.029,12.101)
  pour cut-out: 43.641,12.8 ccw(c44.029,12.8) 44.416,12.8 ccw(c44.029,12.8) 44.029,13.187 ccw(c44.029,12.8)
  pour cut-out: 39.392,21.557 ccw(c39.78,21.557) 40.167,21.557 ccw(c39.78,21.557) 39.78,21.944 ccw(c39.78,21.557)
  pour cut-out: 38.873,22.19 ccw(c39.26,22.19) 39.647,22.19 ccw(c39.26,22.19) 39.26,22.577 ccw(c39.26,22.19)
  pour cut-out: 38.871,22.722 ccw(c39.259,22.722) 39.646,22.722 ccw(c39.259,22.722) 39.259,23.11 ccw(c39.259,22.722)
  pour cut-out: 38.193,23.34 ccw(c38.58,23.34) 38.967,23.34 ccw(c38.58,23.34) 38.58,23.727 ccw(c38.58,23.34)
  pour cut-out: 35.363,22.453 ccw(c35.75,22.453) 36.137,22.453 ccw(c35.75,22.453) 35.75,22.841 ccw(c35.75,22.453)
  pour cut-out: 32.143,20.6 ccw(c32.53,20.6) 32.917,20.6 ccw(c32.53,20.6) 32.53,20.987 ccw(c32.53,20.6)
  pour cut-out: 33.622,20.6 ccw(c34.01,20.6) 34.397,20.6 ccw(c34.01,20.6) 34.01,20.987 ccw(c34.01,20.6)
  pour cut-out: 35.362,20.6 ccw(c35.75,20.6) 36.137,20.6 ccw(c35.75,20.6) 35.75,20.987 ccw(c35.75,20.6)
  pour cut-out: 36.882,20.48 ccw(c37.27,20.48) 37.657,20.48 ccw(c37.27,20.48) 37.27,20.867 ccw(c37.27,20.48)
  pour cut-out: 36.883,18.75 ccw(c37.27,18.75) 37.657,18.75 ccw(c37.27,18.75) 37.27,19.137 ccw(c37.27,18.75)
  pour cut-out: 35.363,18.75 ccw(c35.75,18.75) 36.137,18.75 ccw(c35.75,18.75) 35.75,19.137 ccw(c35.75,18.75)
  pour cut-out: 32.103,18.74 ccw(c32.49,18.74) 32.877,18.74 ccw(c32.49,18.74) 32.49,19.127 ccw(c32.49,18.74)
  pour cut-out: 33.622,18.78 ccw(c34.01,18.78) 34.397,18.78 ccw(c34.01,18.78) 34.01,19.167 ccw(c34.01,18.78)
  pour cut-out: 34.153,16.74 ccw(c34.54,16.74) 34.927,16.74 ccw(c34.54,16.74) 34.54,17.127 ccw(c34.54,16.74)
  pour cut-out: 32.253,16.74 ccw(c32.64,16.74) 33.027,16.74 ccw(c32.64,16.74) 32.64,17.127 ccw(c32.64,16.74)
  pour cut-out: 33.834,50.12 ccw(c34.222,50.12) 34.609,50.12 ccw(c34.222,50.12) 34.222,50.507 ccw(c34.222,50.12)
  pour cut-out: 27.242,48.797 ccw(c27.629,48.797) 28.017,48.797 ccw(c27.629,48.797) 27.629,49.185 ccw(c27.629,48.797)
  pour cut-out: 19.513,41.063 ccw(c19.9,41.063) 20.287,41.063 ccw(c19.9,41.063) 19.9,41.451 ccw(c19.9,41.063)
  pour cut-out: 16.363,27.35 ccw(c16.75,27.35) 17.137,27.35 ccw(c16.75,27.35) 16.75,27.737 ccw(c16.75,27.35)
  pour cut-out: 15.863,26.83 ccw(c16.25,26.83) 16.637,26.83 ccw(c16.25,26.83) 16.25,27.217 ccw(c16.25,26.83)
  pour cut-out: 15.293,27.95 ccw(c15.68,27.95) 16.067,27.95 ccw(c15.68,27.95) 15.68,28.337 ccw(c15.68,27.95)
  pour cut-out: 15.293,27.39 ccw(c15.68,27.39) 16.067,27.39 ccw(c15.68,27.39) 15.68,27.777 ccw(c15.68,27.39)
  pour cut-out: 14.833,26.83 ccw(c15.22,26.83) 15.607,26.83 ccw(c15.22,26.83) 15.22,27.217 ccw(c15.22,26.83)
  pour cut-out: 16.739,32.02 ccw(c17.126,32.02) 17.514,32.02 ccw(c17.126,32.02) 17.126,32.407 ccw(c17.126,32.02)
  pour cut-out: 19.663,19.991 ccw(c20.05,19.991) 20.437,19.991 ccw(c20.05,19.991) 20.05,20.378 ccw(c20.05,19.991)
  pour cut-out: 18.903,19.991 ccw(c19.29,19.991) 19.677,19.991 ccw(c19.29,19.991) 19.29,20.378 ccw(c19.29,19.991)
  pour cut-out: 20.61,21.817 ccw(c20.998,21.817) 21.385,21.817 ccw(c20.998,21.817) 20.998,22.205 ccw(c20.998,21.817)
  pour cut-out: 20.113,23.442 ccw(c20.5,23.442) 20.887,23.442 ccw(c20.5,23.442) 20.5,23.829 ccw(c20.5,23.442)
  pour cut-out: 20.113,24.1 ccw(c20.5,24.1) 20.887,24.1 ccw(c20.5,24.1) 20.5,24.487 ccw(c20.5,24.1)
  pour cut-out: 18.763,22.36 ccw(c19.15,22.36) 19.537,22.36 ccw(c19.15,22.36) 19.15,22.747 ccw(c19.15,22.36)
  pour cut-out: 18.243,22.95 ccw(c18.63,22.95) 19.017,22.95 ccw(c18.63,22.95) 18.63,23.337 ccw(c18.63,22.95)
  pour cut-out: 18.763,23.45 ccw(c19.15,23.45) 19.537,23.45 ccw(c19.15,23.45) 19.15,23.837 ccw(c19.15,23.45)
  pour cut-out: 18.243,23.95 ccw(c18.63,23.95) 19.017,23.95 ccw(c18.63,23.95) 18.63,24.337 ccw(c18.63,23.95)
  pour cut-out: 18.763,24.53 ccw(c19.15,24.53) 19.537,24.53 ccw(c19.15,24.53) 19.15,24.917 ccw(c19.15,24.53)
  pour cut-out: 14.733,18.73 ccw(c15.12,18.73) 15.507,18.73 ccw(c15.12,18.73) 15.12,19.117 ccw(c15.12,18.73)
  pour cut-out: 16.363,20.64 ccw(c16.75,20.64) 17.137,20.64 ccw(c16.75,20.64) 16.75,21.027 ccw(c16.75,20.64)
  pour cut-out: 15.863,19.55 ccw(c16.25,19.55) 16.637,19.55 ccw(c16.25,19.55) 16.25,19.937 ccw(c16.25,19.55)
  pour cut-out: 15.363,20.03 ccw(c15.75,20.03) 16.137,20.03 ccw(c15.75,20.03) 15.75,20.417 ccw(c15.75,20.03)
  pour cut-out: 14.663,19.66 ccw(c15.05,19.66) 15.437,19.66 ccw(c15.05,19.66) 15.05,20.047 ccw(c15.05,19.66)
  pour cut-out: 13.393,19.49 ccw(c13.78,19.49) 14.167,19.49 ccw(c13.78,19.49) 13.78,19.877 ccw(c13.78,19.49)
  pour cut-out: 13.393,20.47 ccw(c13.78,20.47) 14.167,20.47 ccw(c13.78,20.47) 13.78,20.857 ccw(c13.78,20.47)
  pour cut-out: 12.936,21.285 ccw(c13.324,21.285) 13.711,21.285 ccw(c13.324,21.285) 13.324,21.672 ccw(c13.324,21.285)
  pour cut-out: 13.863,22.45 ccw(c14.25,22.45) 14.637,22.45 ccw(c14.25,22.45) 14.25,22.837 ccw(c14.25,22.45)
  pour cut-out: 15.113,22.45 ccw(c15.5,22.45) 15.887,22.45 ccw(c15.5,22.45) 15.5,22.837 ccw(c15.5,22.45)
  pour cut-out: 16.363,22.45 ccw(c16.75,22.45) 17.137,22.45 ccw(c16.75,22.45) 16.75,22.837 ccw(c16.75,22.45)
  pour cut-out: 16.363,23.7 ccw(c16.75,23.7) 17.137,23.7 ccw(c16.75,23.7) 16.75,24.087 ccw(c16.75,23.7)
  pour cut-out: 15.113,23.7 ccw(c15.5,23.7) 15.887,23.7 ccw(c15.5,23.7) 15.5,24.087 ccw(c15.5,23.7)
  pour cut-out: 16.363,24.95 ccw(c16.75,24.95) 17.137,24.95 ccw(c16.75,24.95) 16.75,25.337 ccw(c16.75,24.95)
  pour cut-out: 13.863,23.7 ccw(c14.25,23.7) 14.637,23.7 ccw(c14.25,23.7) 14.25,24.087 ccw(c14.25,23.7)
  pour cut-out: 15.113,24.95 ccw(c15.5,24.95) 15.887,24.95 ccw(c15.5,24.95) 15.5,25.337 ccw(c15.5,24.95)
  pour cut-out: 13.863,24.95 ccw(c14.25,24.95) 14.637,24.95 ccw(c14.25,24.95) 14.25,25.337 ccw(c14.25,24.95)
  pour cut-out: 11.463,21.95 ccw(c11.85,21.95) 12.237,21.95 ccw(c11.85,21.95) 11.85,22.337 ccw(c11.85,21.95)
  pour cut-out: 11.983,22.45 ccw(c12.37,22.45) 12.757,22.45 ccw(c12.37,22.45) 12.37,22.837 ccw(c12.37,22.45)
  pour cut-out: 11.463,22.95 ccw(c11.85,22.95) 12.237,22.95 ccw(c11.85,22.95) 11.85,23.337 ccw(c11.85,22.95)
  pour cut-out: 11.983,23.95 ccw(c12.37,23.95) 12.757,23.95 ccw(c12.37,23.95) 12.37,24.337 ccw(c12.37,23.95)
  pour cut-out: 11.463,24.45 ccw(c11.85,24.45) 12.237,24.45 ccw(c11.85,24.45) 11.85,24.837 ccw(c11.85,24.45)
  pour cut-out: 10.563,26.06 ccw(c10.95,26.06) 11.337,26.06 ccw(c10.95,26.06) 10.95,26.447 ccw(c10.95,26.06)
  pour cut-out: 10.563,26.79 ccw(c10.95,26.79) 11.337,26.79 ccw(c10.95,26.79) 10.95,27.177 ccw(c10.95,26.79)
  pour cut-out: 8.963,26.06 ccw(c9.35,26.06) 9.737,26.06 ccw(c9.35,26.06) 9.35,26.447 ccw(c9.35,26.06)
  pour cut-out: 8.323,26.77 ccw(c8.71,26.77) 9.097,26.77 ccw(c8.71,26.77) 8.71,27.157 ccw(c8.71,26.77)
  pour cut-out: 62.754,43.58 ccw(c62.874,43.92) 62.854,44.28 ccw(c62.873,43.92)
  pour cut-out: 96.209,54.026 96.209,52.33 99.917,52.33 99.917,54.026
  pour cut-out: 35.818,14.113 34.94,13.234 34.898,13.234 34.898,14.074 34.788,14.184
  pour cut-out: 43.587,18.827 44.153,18.827 44.153,18.637 44.35,18.44 43.398,18.44 43.587,18.63
Middle Layer 3:
  pour cut-out: 60.504,18.36 ccw(c60.624,18.7) 60.604,19.06 ccw(c60.623,18.7)
  pour cut-out: 97.009,14.68 ccw(c97.128,15.02) 97.109,15.38 ccw(c97.128,15.02)
  pour cut-out: 96.097,14.983 ccw(c96.217,15.323) 96.197,15.683 ccw(c96.216,15.323)
  pour cut-out: 97.009,15.23 ccw(c97.128,15.57) 97.109,15.93 ccw(c97.128,15.57)
  pour cut-out: 56.134,16.87 ccw(c56.254,17.21) 56.234,17.57 ccw(c56.254,17.21)
  pour cut-out: 56.874,17.61 ccw(c56.994,17.95) 56.974,18.31 ccw(c56.994,17.95)
  pour cut-out: 103.429,27.86 ccw(c103.644,28.481) 103.605,29.136 ccw(c103.644,28.481)
  pour cut-out: 63.824,18.36 ccw(c63.943,18.7) 63.924,19.06 ccw(c63.943,18.7)
  pour cut-out: 62.224,18.36 ccw(c62.343,18.7) 62.324,19.06 ccw(c62.343,18.7)
  pour cut-out: 63.824,16.49 ccw(c63.943,16.83) 63.924,17.19 ccw(c63.943,16.83)
  pour cut-out: 62.224,16.49 ccw(c62.343,16.83) 62.324,17.19 ccw(c62.343,16.83)
Middle Layer 1:
  pour cut-out: 96.28,51.117 ccw(c97.071,51.187) 97.588,51.791 ccw(c97.073,51.184)
  pour cut-out: 98.28,51.117 ccw(c99.071,51.187) 99.588,51.791 ccw(c99.073,51.184)
Middle Layer 5 (PWR):
  pour cut-out: 98.28,51.117 ccw(c99.071,51.187) 99.588,51.791 ccw(c99.073,51.184)
  pour cut-out: 30.704,19.82 ccw(c30.824,20.16) 30.804,20.52 ccw(c30.823,20.16)
  pour cut-out: 30.704,20.77 ccw(c30.824,21.11) 30.804,21.47 ccw(c30.823,21.11)
  pour cut-out: 96.28,51.117 ccw(c97.071,51.187) 97.588,51.791 ccw(c97.073,51.184)
  pour cut-out: 95.084,49.67 ccw(c95.204,50.01) 95.184,50.37 ccw(c95.203,50.01)
  pour cut-out: 61.514,42.84 ccw(c61.634,43.18) 61.614,43.54 ccw(c61.633,43.18)
  pour cut-out: 61.644,46.662 ccw(c61.764,47.002) 61.744,47.362 ccw(c61.763,47.002)
  pour cut-out: 20.633,15.68 ccw(c20.752,16.02) 20.733,16.38 ccw(c20.752,16.02)
  pour cut-out: 20.239,15.06 ccw(c20.359,15.4) 20.339,15.76 ccw(c20.358,15.4)
  pour cut-out: 34.835,27.73 ccw(c34.954,28.07) 34.935,28.43 ccw(c34.954,28.07)
  pour cut-out: 65.512,2.242 cw(c66.614,2.415) 67.256,1.502 cw(c66.614,2.415)
  pour cut-out: 79.025,25.928 ccw(c79.144,26.268) 79.125,26.628 ccw(c79.144,26.268)
  pour cut-out: 100.523,44.66 ccw(c100.643,45) 100.623,45.36 ccw(c100.643,45)
  pour cut-out: 100.529,45.495 ccw(c100.649,45.835) 100.629,46.195 ccw(c100.648,45.835)
  pour cut-out: 100.523,46.32 ccw(c100.643,46.66) 100.623,47.02 ccw(c100.643,46.66)
  pour cut-out: 100.701,32.975 ccw(c100.821,33.315) 100.801,33.675 ccw(c100.821,33.315)
  pour cut-out: 100.701,33.535 ccw(c100.821,33.875) 100.801,34.235 ccw(c100.821,33.875)
  pour cut-out: 100.513,15.62 ccw(c100.633,15.96) 100.613,16.32 ccw(c100.633,15.96)
  pour cut-out: 100.519,15.025 ccw(c100.639,15.365) 100.619,15.725 ccw(c100.638,15.365)
  pour cut-out: 100.513,14.4 ccw(c100.633,14.74) 100.613,15.1 ccw(c100.633,14.74)
  pour cut-out: 101.329,17.355 ccw(c101.544,17.976) 101.505,18.631 ccw(c101.544,17.976)
  pour cut-out: 103.429,27.86 ccw(c103.644,28.481) 103.605,29.136 ccw(c103.644,28.481)
  pour cut-out: 90.702,2.242 cw(c91.804,2.415) 92.446,1.502 cw(c91.804,2.415)
  pour cut-out: 85.622,2.242 cw(c86.724,2.415) 87.366,1.502 cw(c86.724,2.415)
  pour cut-out: 83.082,2.242 cw(c84.184,2.415) 84.826,1.502 cw(c84.184,2.415)
  pour cut-out: 80.542,2.242 cw(c81.644,2.415) 82.286,1.502 cw(c81.644,2.415)
  pour cut-out: 75.672,2.242 cw(c76.774,2.415) 77.416,1.502 cw(c76.774,2.415)
  pour cut-out: 70.592,2.242 cw(c71.694,2.415) 72.336,1.502 cw(c71.694,2.415)
  pour cut-out: 68.052,2.242 cw(c69.154,2.415) 69.796,1.502 cw(c69.154,2.415)
  pour cut-out: 27.513,48.447 ccw(c27.633,48.787) 27.613,49.147 ccw(c27.633,48.787)
  pour cut-out: 23.074,42.435 ccw(c23.194,42.775) 23.174,43.135 ccw(c23.193,42.775)
  pour cut-out: 19.48,48.28 ccw(c19.6,48.62) 19.58,48.98 ccw(c19.6,48.62)
  pour cut-out: 19.48,47.69 ccw(c19.6,48.03) 19.58,48.39 ccw(c19.6,48.03)
  pour cut-out: 19.48,47.09 ccw(c19.6,47.43) 19.58,47.79 ccw(c19.6,47.43)
  pour cut-out: 19.48,46.49 ccw(c19.6,46.83) 19.58,47.19 ccw(c19.6,46.83)
  pour cut-out: 19.784,40.713 ccw(c19.903,41.053) 19.884,41.413 ccw(c19.903,41.053)
  pour cut-out: 19.174,19.641 ccw(c19.294,19.981) 19.274,20.341 ccw(c19.293,19.981)
  pour cut-out: 97.269,3.415 ccw(c97.389,3.755) 97.369,4.115 ccw(c97.388,3.755)
  pour cut-out: 94.054,3.415 ccw(c94.174,3.755) 94.154,4.115 ccw(c94.173,3.755)
  pour cut-out: 63.104,3.59 ccw(c63.224,3.93) 63.204,4.29 ccw(c63.223,3.93)
  pour cut-out: 21.282,10.48 ccw(c21.401,10.82) 21.382,11.18 ccw(c21.401,10.82)
  pour cut-out: 50.504,27.81 ccw(c50.624,28.15) 50.604,28.51 ccw(c50.623,28.15)
  pour cut-out: 20.384,23.75 ccw(c20.504,24.09) 20.484,24.45 ccw(c20.503,24.09)
  pour cut-out: 20.384,23.092 ccw(c20.504,23.432) 20.484,23.792 ccw(c20.503,23.432)
  pour cut-out: 20.882,21.467 ccw(c21.001,21.807) 20.982,22.167 ccw(c21.001,21.807)
  pour cut-out: 19.934,19.641 ccw(c20.054,19.981) 20.034,20.341 ccw(c20.053,19.981)
  pour cut-out: 55.513,38.775 ccw(c55.633,39.115) 55.613,39.475 ccw(c55.633,39.115)
  pour cut-out: 55.042,39.515 ccw(c55.161,39.855) 55.142,40.215 ccw(c55.161,39.855)
  pour cut-out: 54.467,41.355 ccw(c54.587,41.695) 54.567,42.055 ccw(c54.587,41.695)
  pour cut-out: 45.724,49.63 ccw(c45.844,49.97) 45.824,50.33 ccw(c45.843,49.97)
  pour cut-out: 45.134,49.63 ccw(c45.254,49.97) 45.234,50.33 ccw(c45.253,49.97)
  pour cut-out: 34.106,49.77 ccw(c34.225,50.11) 34.206,50.47 ccw(c34.225,50.11)
  pour cut-out: 65.682,27.849 cw(c67.285,28.726) 68.78,27.675 cw(c67.285,28.726)
  pour cut-out: 63.482,49.349 cw(c65.085,50.226) 66.58,49.175 cw(c65.085,50.226)
  pour cut-out: 70.771,44.594 71.49,44.594 71.49,44.9 70.775,44.9 cw(c70.775,45.105) 70.63,44.96
  pour cut-out: 43.912,11.751 ccw(c44.032,12.091) 44.012,12.451 ccw(c44.032,12.091)
  pour cut-out: 38.926,19.05 ccw(c39.046,19.39) 39.026,19.75 ccw(c39.046,19.39)
  pour cut-out: 38.926,19.605 ccw(c39.046,19.945) 39.026,20.305 ccw(c39.046,19.945)
  pour cut-out: 51.977,17.63 ccw(c52.097,17.97) 52.077,18.33 ccw(c52.097,17.97)
  pour cut-out: 47.284,9.08 ccw(c47.404,9.42) 47.384,9.78 ccw(c47.403,9.42)
  pour cut-out: 34.394,10.12 ccw(c34.514,10.46) 34.494,10.82 ccw(c34.513,10.46)
  pour cut-out: 46.939,36.275 ccw(c47.059,36.615) 47.039,36.975 ccw(c47.058,36.615)
  pour cut-out: 100.654,6.78 ccw(c100.774,7.12) 100.754,7.48 ccw(c100.773,7.12)
  pour cut-out: 52.584,6.25 ccw(c52.704,6.59) 52.684,6.95 ccw(c52.703,6.59)
  pour cut-out: 105.838,46.534 ccw(c106.053,47.154) 106.014,47.81 ccw(c106.053,47.154)
  pour cut-out: 105.573,43.154 ccw(c105.692,43.494) 105.673,43.854 ccw(c105.692,43.494)
  pour cut-out: 34.424,16.39 ccw(c34.544,16.73) 34.524,17.09 ccw(c34.543,16.73)
  pour cut-out: 41.374,17.63 ccw(c41.494,17.97) 41.474,18.33 ccw(c41.493,17.97)
  pour cut-out: 53.012,6.677 ccw(c53.132,7.017) 53.112,7.377 ccw(c53.132,7.017)
  pour cut-out: 117.309,11.104 ccw(c117.429,11.444) 117.409,11.804 ccw(c117.428,11.444)
  pour cut-out: 116.474,11.11 ccw(c116.594,11.45) 116.574,11.81 ccw(c116.593,11.45)
  pour cut-out: 115.649,11.104 ccw(c115.769,11.444) 115.749,11.804 ccw(c115.768,11.444)
  pour cut-out: 101.81,6.78 ccw(c101.93,7.12) 101.91,7.48 ccw(c101.93,7.12)
  pour cut-out: 50.58,27.783 50.582,27.785 50.944,27.785 50.944,27.876 50.958,27.891
  pour cut-out: 50.26,28.365 50.26,28.184 50.425,28.348
  pour cut-out: 71.796,45.518 71.796,44.9 71.49,44.9 71.49,45.518
  pour cut-out: 70.771,45.823 71.49,45.823 71.49,45.518 70.771,45.518
  pour cut-out: 70.465,45.518 70.465,44.9 70.771,44.9 70.771,45.509
  pour cut-out: 34.157,10.511 34.178,10.489 34.882,10.489 34.882,9.901 34.694,9.714 34.148,9.714
  pour cut-out: 40.308,35.666 41.02,35.666 41.02,35.054 40.308,35.054
  pour cut-out: 115.749,11.804 117.409,11.804 117.466,11.747 117.466,11.086 115.734,11.086 115.725,11.077
  pour cut-out: 26.514,32.065 26.514,31.647 26.267,31.4 26.99,31.4 27,31.39 27.194,31.584 27.255,31.584
  pour cut-out: 26.02,30.159 26.82,30.159 26.82,30.587 26.577,30.83 26.31,30.83
Middle Layer 4:
  pour cut-out: 34.424,16.39 ccw(c34.544,16.73) 34.524,17.09 ccw(c34.543,16.73)
  pour cut-out: 34.394,10.12 ccw(c34.514,10.46) 34.494,10.82 ccw(c34.513,10.46)
Bottom Layer:
  pour cut-out: 27.513,48.447 ccw(c27.633,48.787) 27.613,49.147 ccw(c27.633,48.787)
  pour cut-out: 96.28,57.117 ccw(c97.071,57.187) 97.588,57.791 ccw(c97.073,57.184)
  pour cut-out: 98.28,57.117 ccw(c99.071,57.187) 99.588,57.791 ccw(c99.073,57.184)
  pour cut-out: 98.28,59.117 ccw(c99.071,59.187) 99.588,59.791 ccw(c99.073,59.184)
  pour cut-out: 96.28,59.117 ccw(c97.071,59.187) 97.588,59.791 ccw(c97.073,59.184)
  pour cut-out: 98.28,61.117 ccw(c99.071,61.187) 99.588,61.791 ccw(c99.073,61.184)
  pour cut-out: 96.28,61.117 ccw(c97.071,61.187) 97.588,61.791 ccw(c97.073,61.184)
  pour cut-out: 27.96,41.082 cw(c28.01,39.756) 27.96,38.429 cw(c28.01,39.756)
  pour cut-out: 27.96,24.082 cw(c28.01,22.756) 27.96,21.429 cw(c28.01,22.756)
  pour cut-out: 26.422,18.369 cw(c28.025,19.246) 29.52,18.195 cw(c28.025,19.246)
  pour cut-out: 26.422,42.369 cw(c28.025,43.246) 29.52,42.195 cw(c28.025,43.246)
  pour cut-out: 13.945,15.073 13.945,13.099 15.94,13.099 15.94,15.073
  pour cut-out: 38.55,29.155 38.55,30.515 38.81,30.515 38.81,29.155
  pour cut-out: 34.1,27.02 34.1,25.66 33.84,25.66 33.84,27.02
  pour cut-out: 34.11,37.24 34.11,35.88 33.85,35.88 33.85,37.24
  pour cut-out: 34.11,35.44 34.11,34.08 33.85,34.08 33.85,35.44
  pour cut-out: 34.1,30.59 34.1,29.23 33.84,29.23 33.84,30.59
  pour cut-out: 34.1,28.74 34.1,27.38 33.84,27.38 33.84,28.74
  pour cut-out: 25.514,22.43 24.154,22.43 24.154,22.69 25.514,22.69
  pour cut-out: 23.75,26.19 22.39,26.19 22.39,26.45 23.75,26.45
  pour cut-out: 22.389,30.3 23.749,30.3 23.749,30.04 22.389,30.04
  pour cut-out: 22.389,34.26 23.749,34.26 23.749,34 22.389,34
  pour cut-out: 22.19,36.27 22.19,37.63 22.45,37.63 22.45,36.27
  pour cut-out: 24.58,40.29 25.94,40.29 25.94,40.03 24.58,40.03
  pour cut-out: 22.67,40.29 24.03,40.29 24.03,40.03 22.67,40.03
  pour cut-out: 29.94,40.29 31.3,40.29 31.3,40.03 29.94,40.03
  pour cut-out: 31.8,40.29 33.16,40.29 33.16,40.03 31.8,40.03
  pour cut-out: 37.83,32.905 37.83,31.545 37.57,31.545 37.57,32.905

## Silkscreen, mask and mechanical layers (free items; w line width, h text height)
Top Overlay:
  drawing of 154 lines, arcs and shapes, not listed
  text "SD CARD" at 1.44,64.09 h0.8
  text "DDR3 PL" at 87.52,59.64 h0.8
  text "BANK 501" at 29.98,58.84 h0.8
  text "EXT PWR" at 100.58,58.26 h0.8
  text "PWR DDR3 PL" at 53.57,57.59 h0.8
  text "JTAG" at 45.47,57.09 h0.8
  text "DDR3 PL" at 100.58,56.94 h0.8
  text "+5V" at 101.36,55.04 h0.8
  text "GND" at 115.34,54.78 h0.8 r90
  text "POWER" at 118.85,53.13 h0.8 r90
  text "EXTERNAL" at 117.56,52.09 h0.8 r90
  text "DDR3 PS" at 25.43,50.75 h0.8
  text "RST" at 32.74,50.75 h0.8
  text "1 - B501 ON 1.8V, OFF 3.3V" at 46.6,50.29 h0.6
  text "BOOT" at 41.875,49.98 h0.8
  text "2,3 -ON (SD CARD BOOT)" at 46.531,49.207 h0.6
  text "1" at 41.15,48.84 h0.6
  text "3" at 45.25,48.84 h0.6
  text "33.333 MHz" at 47.141,46.955 h0.6
  text "FBGA-96" at 20.99,43.588 h0.8 r90
  text "USB OTG" at 1.44,42.94 h0.8
  text "XC7Z020-" at 56.569,38.497 h0.6
  text "2CLG400I" at 56.569,37.456 h0.6
  text "+5V" at 103.229,36.877 h0.6
  text "(CLG-400)" at 56.569,36.426 h0.6
  text "+1.0V" at 113.646,33.056 h0.6
  text "EXT" at 58.525,31.607 h0.8
  text "FORM" at 58.29,26.507 h0.8
  text "L1" at 1.22,26.23 h0.6 r90
  text "L2" at 1.22,24.22 h0.6 r90
  text "OTG" at 1.22,22.06 h0.6 r90
  text "DCDC" at 58.31,21.44 h0.8
  text "+3" at 1.22,20.38 h0.6 r90
  text "RS" at 1.22,18.63 h0.6 r90
  text "RX" at 1.22,16.79 h0.6 r90
  text "+1.8V" at 115.807,15.899 h0.6
  text "TX" at 1.22,14.9 h0.6 r90
  text "+3.3V" at 35.75,14.77 h0.6
  text "+3.3V" at 112.963,13.635 h0.6
  text "+1.35V" at 109.35,13.625 h0.6
  text "+5V PC" at 16.38,12.75 h0.6
  text "FBGA-96" at 88.091,12.507 h0.8
  text "MT41K512M16VRN-107" at 70.476,11.76 h1.6
  text "DONE" at 53.46,11.23 h0.8 r90
  text "MT41K256M16TW-107" at 70.476,10.538 h1.6
  text "PWR B501" at 27.06,9.48 h0.8
  text "PWR B13" at 43.24,9.48 h0.8
  text "PWR B34,B35" at 50.061,9.48 h0.8
  text "ИЛ1270ТО1/1" at 70.476,9.321 h1.6
  text "+1.8V" at 36.589,6.977 h0.6
  text "BANK 13" at 54.07,6.93 h0.8
  text "PWR DDR3 PS" at 20.86,1.76 h0.8
  text "UART" at 1.44,1.23 h0.8
Bottom Overlay:
  circle w0.2: c103.4,62.79 r1.327
  circle w0.2: c116.8,62.79 r1.327
  circle w0.2: c3.385,59.57 r1.23
  circle w0.2: c3.385,51.57 r1.23
  circle w0.2: c28.02,22.765 r1.384
  circle w0.2: c28.02,39.765 r1.385
  circle w0.2: c28.02,43.265 r1.863
  circle w0.2: c28.02,19.265 r1.863
  lines w0.2: 29.96,6.31 29.96,2.323 59.963,2.323 59.971,2.331 59.971,6.321 29.971,6.321 ; 29.96,64.19 29.96,60.203 59.963,60.203 59.971,60.211 59.971,64.201 29.971,64.201 ; 96.064,34.206 96.064,64.206 100.054,64.206 ; 96.075,34.195 100.062,34.195 100.062,64.198
  text "ZYNQ BOARD" at 19.507,62.338 h3
Board:
  the board outline again, w0.127

## Dimensions
120,0 to 120,66 on Mechanical 1
120,66 to 0,66 on Mechanical 1